# Altium PCB Car_wash_machine.PcbDoc (part 6 of 6)
Units mm, origin at the board's own origin, x right, y up, seen from the top; angles counter-clockwise.
Board outline 229.74 x 149.86 mm, 2 copper layers (Top Layer, Bottom Layer); 256 components, 170 nets, 868 pads, 731 vias.
Unrouted connection lines stored in the file: 362.
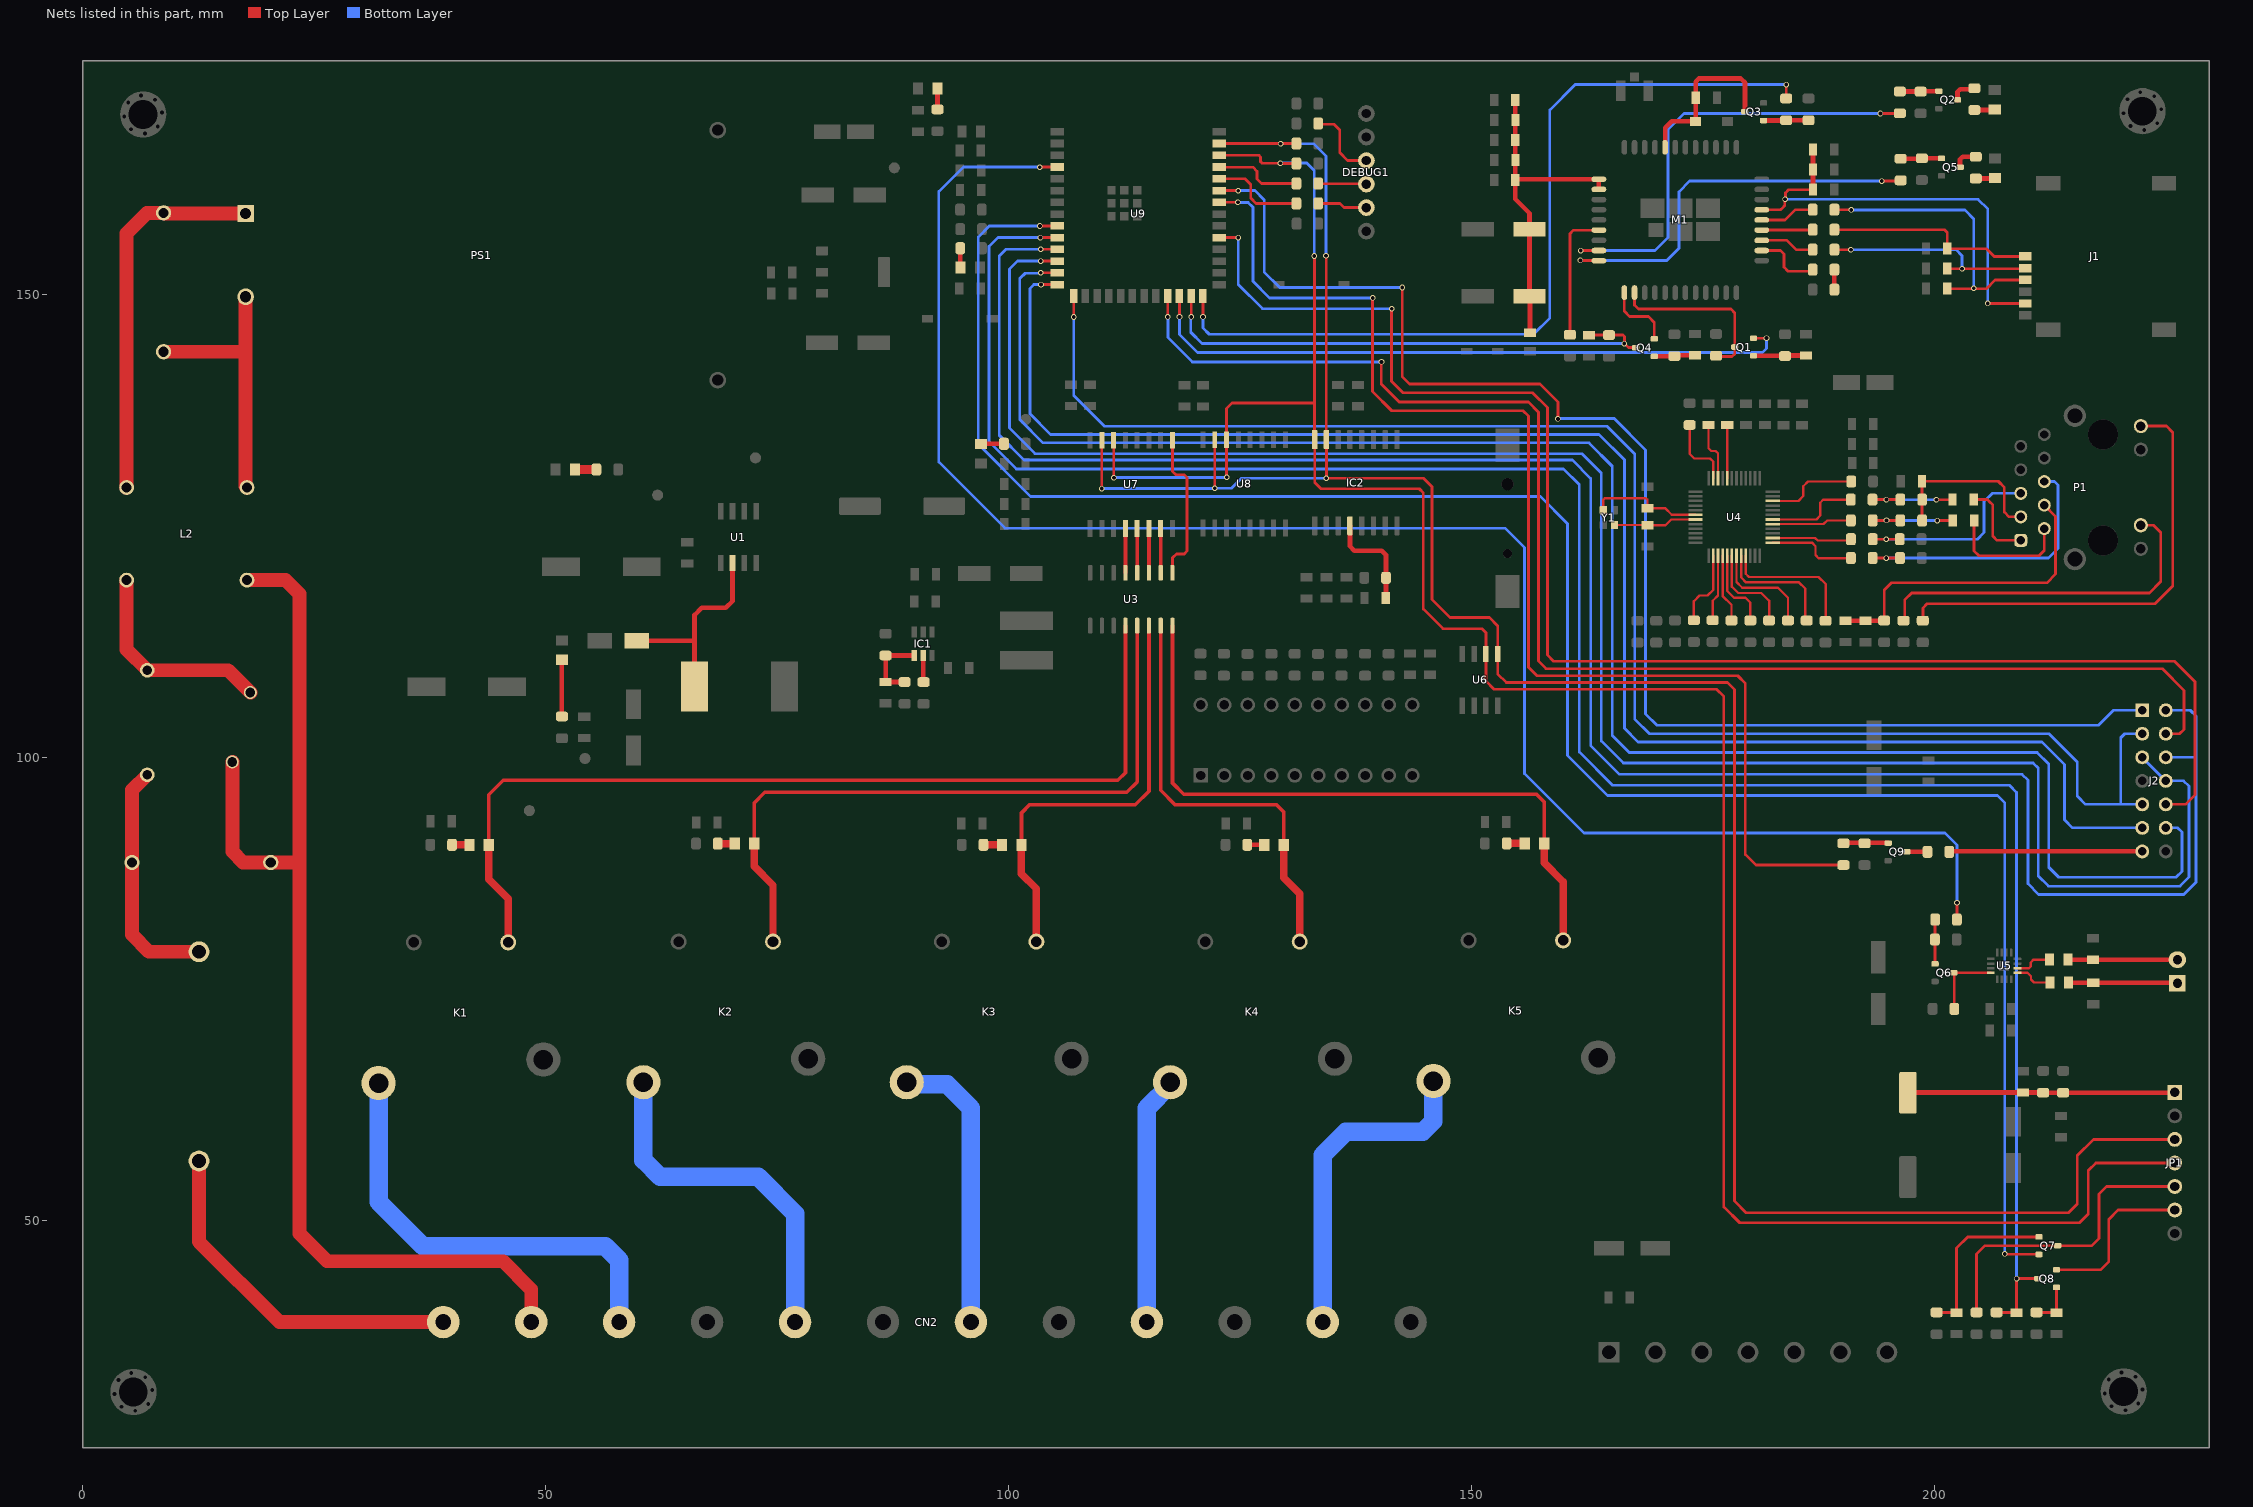
[diagram p3: the nets of this part, all layers, seen from the top]

## Via types
v1: diameter 0.6, hole 0.4, Top Layer to Bottom Layer, tented both sides, 730 vias
v2: diameter 0.6/0.6 (per signal layer), hole 0.4, Top Layer to Bottom Layer, tented both sides, 1 vias

## Nets (pads, with @x,y where several pads share a name; then routed paths per layer and width w, separated by ;. In a path a pad name is that pad's centre, name@x,y a point inside that pad or via, vN(x,y) a via of type N, cw(c..) or ccw(c..) an arc to the next point about the centre after c; other vN are vias at no path point) (continued)
NetC6_2: C6.2 IC1.4 R5.1 R7.2 | length 8
  Top Layer w0.5: C6.2@86.741,108.135 R5.1@88.798,108.134 ; C6.2@86.776,108.169 86.741,108.204 R7.2@86.741,110.991 86.752,111.002 89.844,111.002 IC1.4@89.855,111.013
NetC16_2: C16.2 C17.2 C18.2 C19.2 C20.2 EC4.1 EC5.1 L4.1 M1.34 M1.35 | length 35.9
  Top Layer w0.5: C16.2@154.775,171.018 154.778,171.015 154.778,168.863 C17.2@154.782,168.859 154.778,168.856 154.778,166.704 C18.2@154.775,166.7 154.778,166.697 154.778,164.545 C19.2@154.782,164.541 154.778,164.538 154.778,162.468 C20.2@154.82,162.427 ; L4.1@156.35,145.856 156.35,149.758 EC4.1@156.299,149.809 EC5.1@156.299,157.048 156.299,158.788 154.775,160.312 C20.2@154.775,162.382 C20.2@154.82,162.427 ; M1.35@163.793,161.346 M1.34@163.793,162.446 163.774,162.427 C20.2@154.82,162.427
NetC21_2: C21.2 Q1.1 R14.1 | length 5.7
  Top Layer w0.5: Q1.1@180.492,143.37 R14.1@183.871,143.37 ; R14.1@183.896,143.345 183.959,143.408 C21.2@186.144,143.408
NetC22_1: C22.1 C23.2 C24.2 J1.C1 M1.18 | length 48.1
  Top Layer w0.3: M1.18@181.393,159.146 183.429,159.146 183.629,159.347 183.864,159.581 183.864,160.229 183.966,160.331 183.966,160.979 184.302,161.315 C22.1@186.919,161.315 ; v1@205.803,149.022 v1(205.812,149.03) J1.C1@209.832,149.03
  Top Layer w0.5: C22.1@186.919,161.315 C23.2@186.919,163.474 C24.2@186.919,165.633
  Bottom Layer w0.3: v1(183.909,160.274) 204.753,160.274 205.812,159.215 v1(205.812,149.03)
NetC25_2: C25.2 C34.1 P1.4 R22.2 | length 34.7
  Top Layer w0.3: R22.2@194.615,114.776 194.615,118.085 195.377,118.847 212.192,118.847 213.131,119.786 213.131,126.023 P1.4@211.909,127.246
  Top Layer w0.5: C34.1@190.43,114.751 192.576,114.751 C25.2@192.583,114.745 192.599,114.76 194.599,114.76 R22.2@194.615,114.776 ; C34.1@190.475,114.757 C34.1@190.481,114.751
NetC26_2: C26.2 U4.20 | length 5.8
  Top Layer w0.25: U4.20@177.66,130.135 C26.2@177.66,135.903
NetC27_2: C27.2 U4.22 | length 6.5
  Top Layer w0.25: C27.2@175.628,135.903 175.628,133.388 175.92,133.096 176.403,133.096 176.661,132.838 U4.22@176.661,130.123
NetC28_1: C28.1 P1.1 | length 8.9
  Top Layer w0.3: C28.1@204.299,127.838 205.767,127.838 205.943,127.662 205.943,127.66 206.35,127.254 206.35,123.876 206.79,123.436 P1.1@209.369,123.436
NetC29_1: C29.1 P1.2 | length 13.7
  Top Layer w0.3: C29.1@204.325,125.603 204.325,122.294 204.851,121.768 211.353,121.768 211.909,122.323 P1.2@211.909,124.706
NetC30_1: C30.1 J1.C7 R33.1 | length 23.9
  Top Layer w0.3: R33.1@189.237,154.838 v1(191.021,154.838) ; C30.1@201.423,152.779 201.434,152.768 209.76,152.768 J1.C7@209.771,152.779
  Top Layer w0.5: J1.C7@209.771,152.779 J1.C7@209.832,152.84
  Bottom Layer w0.3: v1(191.021,154.838) 202.362,154.838 203.022,154.178 v1@203.022,152.771
  other v1: 203.022,152.768
NetC31_1: C31.1 J1.C3 R29.1 | length 22.8
  Top Layer w0.3: R29.1@189.237,156.997 201.105,156.997 201.423,156.679 C31.1@201.423,154.938 205.678,154.938 206.507,154.11 J1.C3@209.832,154.11
NetC32_1: C32.1 J1.C2 R25.1 | length 31.8
  Top Layer w0.3: R25.1@189.237,159.156 189.249,159.144 191.046,159.144 v1(191.059,159.131) ; C32.1@201.423,150.62 205.649,150.62 206.599,151.57 J1.C2@209.832,151.57
  Bottom Layer w0.3: v1(191.059,159.131) 203.327,159.131 204.292,158.166 v1(204.292,150.66)
NetC33_1: C33.1 P1.3 R39.2 R40.2 | length 18.1
  Top Layer w0.3: R40.2@198.705,125.59 198.708,125.593 198.708,127.835 R39.2@198.711,127.838 198.711,129.813 C33.1@198.704,129.819 206.934,129.819 207.594,129.159 207.594,126.492 208.111,125.976 P1.3@209.369,125.976
NetC35_2: C35.2 Q4.1 R41.1 | length 4.4
  Top Layer w0.5: Q4.1@169.78,143.309 R41.1@171.916,143.309 ; R41.1@171.931,143.324 172.034,143.427 C35.2@174.18,143.427
NetC37_1: C37.1 D8.2 M1.29 Q3.3 | length 18.8
  Top Layer w0.5: M1.29@170.943,165.896 170.943,167.997 171.657,168.711 174.25,168.711 C37.1@174.25,171.247 174.25,172.98 174.6,173.33 179.121,173.33 179.584,172.866 Q3.3@179.584,169.736
NetC61_1: C61.1 CN1.1 L6.2 | length 11.8
  Top Layer w0.5: L6.2@214.538,75.692 214.563,75.667 217.17,75.667 C61.1@217.195,75.641 226.25,75.641 CN1.1@226.289,75.603
NetC62_1: C62.1 CN1.2 L5.2 | length 11.8
  Top Layer w0.5: L5.2@214.462,78.143 C62.1@217.145,78.143 CN1.2@226.289,78.143
NetC67_2: C67.2 Q7.1 R63.1 | length 18.5
  Top Layer w0.3: R63.1@200.279,40.037 202.413,40.037 C67.2@202.438,40.012 202.438,46.99 203.642,48.194 Q7.1@211.334,48.194
NetC70_2: C70.2 IC2.4 R66.1 | length 11.1
  Top Layer w0.5: IC2.4@136.906,125.012 136.906,122.809 137.389,122.326 140.335,122.326 140.791,121.87 140.791,117.246 C70.2@140.779,117.234
NetC71_2: C71.2 Q8.1 R67.1 | length 4.9
  Top Layer w0.3: R67.1@211.074,40.037 213.208,40.037 C71.2@213.227,40.018 ; Q8.1@213.227,42.738 C71.2@213.227,40.018 ; C71.2@213.233,40.012 C71.2@213.227,40.018
NetCF1_1: CF1.1 CN2.2 L2.3 MOV1.1 | length 123.9
  Top Layer w1.5: MOV1.1@16.172,99.501 16.172,89.818 17.344,88.646 CF1.1@20.327,88.646 23.406,88.646 23.419,88.659 ; L2.3@17.752,119.142 21.916,119.142 23.419,117.64 23.419,88.659 ; CN2.2@48.462,38.989 48.462,42.533 45.428,45.568 26.416,45.568 23.419,48.565 23.419,88.659
NetCF1_2: CF1.2 F1.2 GDT1.A | length 26
  Top Layer w1.5: GDT1.A@6.985,98.109 5.327,96.451 CF1.2@5.327,88.646 5.327,80.843 7.178,78.991 F1.2@12.573,78.991
NetCF2_1: CF2.1 L2.2 PS1.2 | length 29.7
  Top Layer w1.5: CF2.1@8.75,143.813 17.172,143.813 17.612,143.373 ; PS1.2@17.612,149.746 17.612,143.373 ; L2.2@17.752,129.143 17.752,129.17 17.612,129.31 17.612,143.373
NetCF2_2: CF2.2 L2.1 PS1.1 | length 41.2
  Top Layer w1.5: L2.1@4.752,129.143 4.752,156.606 6.96,158.814 CF2.2@8.75,158.814 ; CF2.2@8.818,158.746 PS1.1@17.612,158.746
NetCN2_1: CN2.1 F1.1 | length 38.7
  Top Layer w1.5: F1.1@12.573,56.391 12.573,47.663 21.247,38.989 CN2.1@38.962,38.989
NetD1_2: D1.2 L1.1 U1.2 | length 22.8
  Top Layer w0.5: D1.2@59.874,112.598 66.105,112.598 ; L1.1@66.105,107.645 66.105,112.598 ; U1.2@70.206,120.98 70.206,116.878 69.482,116.154 66.891,116.154 66.105,115.368 66.105,112.598
NetD2_1: D2.1 R2.1 | length 2.3
  Top Layer w1: D2.1@53.209,131.102 R2.1@55.492,131.102
NetD3_1: D3.1 R1.1 | length 6.1
  Top Layer w0.5: R1.1@51.778,104.432 D3.1@51.778,110.532
NetD4_1: D4.1 R4.1 | length 2.5
  Top Layer w0.5: D4.1@97.041,133.841 97.055,133.856 99.509,133.856 R4.1@99.523,133.871
NetD5_1: D5.1 R6.1 | length 2.3
  Top Layer w0.5: R6.1@92.342,169.99 92.348,169.996 92.348,172.256 D5.1@92.354,172.263
NetD7_2: D7.2 R31.2 | length 2.2
  Top Layer w0.5: R31.2@204.357,169.924 206.506,169.924 D7.2@206.554,169.973
NetD9_2: D9.2 R46.2 | length 2.1
  Top Layer w0.5: R46.2@204.506,162.526 206.559,162.526 D9.2@206.601,162.568
NetD10_1: D10.1 R45.1 | length 1.9
  Top Layer w0.8: R45.1@39.91,90.551 D10.1@41.783,90.551
NetD11_1: D11.1 R49.1 | length 1.8
  Top Layer w0.8: R49.1@68.612,90.678 D11.1@70.451,90.678
NetD12_1: D12.1 R50.1 | length 2
  Top Layer w0.8: R50.1@97.314,90.551 D12.1@99.314,90.551
NetD13_1: D13.1 R53.1 | length 1.8
  Top Layer w0.5: R53.1@125.813,90.551 D13.1@127.652,90.551
NetD14_1: D14.1 R54.1 | length 2
  Top Layer w0.8: R54.1@153.829,90.703 D14.1@155.795,90.703
NetD15_1: D15.1 R58.1 | length 2.1
  Top Layer w0.5: R58.1@94.805,154.991 94.816,154.98 94.816,152.944 D15.1@94.826,152.933
NetDEBUG1_3: DEBUG1.3 R80.2 | length 8.3
  Top Layer w0.3: R80.2@133.471,168.465 133.547,168.389 135.166,168.389 135.801,167.754 135.801,165.316 136.652,164.465 DEBUG1.3@138.684,164.465
NetDEBUG1_4: DEBUG1.4 R82.2 | length 5.2
  Top Layer w0.3: R82.2@133.471,161.988 133.503,161.957 138.652,161.957 DEBUG1.4@138.684,161.925
NetDEBUG1_5: DEBUG1.5 R84.2 | length 5.4
  Top Layer w0.3: R84.2@133.471,159.829 135.826,159.829 136.271,159.385 DEBUG1.5@138.684,159.385
NetGDT1_B: GDT1.B L2.4 MOV1.2 | length 22.8
  Top Layer w1.5: L2.4@4.752,119.142 4.752,111.642 GDT1.B@6.985,109.409 15.71,109.409 MOV1.2@18.118,107.001
NetIC1_5: IC1.5 R3.2 | length 2.9
  Top Layer w0.5: IC1.5@90.805,111.013 90.824,110.994 90.824,108.147 R3.2@90.843,108.128
NetJ2_13: J2.13 R78.2 | length 20.9
  Top Layer w0.3: R78.2@201.638,89.789 R78.2@201.67,89.757 ; J2.13@222.46,89.872 J2.13@222.491,89.84
  Top Layer w0.5: R78.2@201.638,89.789 R78.2@201.651,89.802 ; R78.2@201.638,89.872 J2.13@222.46,89.872
NetL5_1: L5.1 U5.10 | length 4.1
  Top Layer w0.25: U5.10@209.004,77.22 210.265,77.22 210.439,77.394 210.439,77.826 210.756,78.143 L5.1@212.462,78.143
NetL6_1: L6.1 U5.9 | length 4.2
  Top Layer w0.25: U5.9@209.004,76.72 210.097,76.72 210.464,76.352 210.464,75.997 210.795,75.667 212.512,75.667 L6.1@212.538,75.692
NetM1_14: M1.14 NC2.2 | length 7.3
  Top Layer w0.3: M1.14@181.393,154.746 183.417,154.746 183.794,154.368 183.794,152.946 184.239,152.502 186.709,152.502 NC2.2@186.887,152.679
NetM1_15: M1.15 R33.2 | length 5.9
  Top Layer w0.3: M1.15@181.393,155.846 184.095,155.846 185.102,154.838 R33.2@186.887,154.838
NetM1_16: M1.16 R29.2 | length 5.5
  Top Layer w0.3: M1.16@181.393,156.946 181.412,156.965 186.854,156.965 R29.2@186.887,156.997
NetM1_17: M1.17 R25.2 | length 6
  Top Layer w0.3: M1.17@181.393,158.046 183.902,158.046 185.012,159.156 R25.2@186.887,159.156
NetM1_39: M1.39 R36.2 | length 14.3
  Top Layer w0.3: R36.2@160.363,145.644 160.668,145.948 160.668,156.553 161.061,156.946 M1.39@163.793,156.946
NetM1_41: M1.41 R35.1 | length 49.4
  Top Layer w0.3: v1(161.823,154.737) 161.828,154.741 163.788,154.741 M1.41@163.793,154.746 ; v1@194.221,169.557 196.291,169.557 R35.1@196.304,169.57
  Bottom Layer w0.3: v1(161.823,154.737) 169.85,154.737 171.272,156.159 171.272,167.818 172.999,169.545 v1(194.208,169.545)
NetM1_42: M1.42 R47.1 | length 43.8
  Top Layer w0.3: v1(161.798,153.67) 161.81,153.658 163.781,153.658 M1.42@163.793,153.646 ; v1(194.348,162.249) 196.323,162.249 R47.1@196.393,162.319
  Bottom Layer w0.3: v1(161.798,153.67) 171.12,153.67 172.441,154.991 172.441,161.087 173.603,162.249 v1(194.348,162.249)
NetNC1_2: NC1.2 NC2.1 | length 2.2
  Top Layer w0.5: NC1.2@189.237,150.52 NC2.1@189.237,152.679
NetP1_12: P1.12 R34.1 | length 38.5
  Top Layer w0.3: R34.1@196.698,114.764 196.825,114.891 196.825,116.98 197.587,117.742 223.253,117.742 224.485,118.974 224.485,124.282 223.702,125.066 P1.12@222.339,125.066
NetP1_14: P1.14 R28.1 | length 49.7
  Top Layer w0.3: R28.1@198.78,114.764 198.806,114.789 198.806,116.141 199.263,116.599 223.888,116.599 225.781,118.491 225.781,135.103 225.107,135.776 P1.14@222.339,135.776
NetQ2_1: Q2.1 R35.2 R38.2 | length 4.2
  Top Layer w0.5: R35.2@196.304,171.92 R38.2@198.546,171.92 ; R38.2@198.552,171.914 198.598,171.96 Q2.1@200.515,171.96
NetQ2_3: Q2.3 R31.1 | length 2.9
  Top Layer w0.5: Q2.3@202.535,171.01 202.535,171.892 202.828,172.185 R31.1@204.446,172.185
NetQ3_1: Q3.1 R43.2 R44.2 | length 4.9
  Top Layer w0.5: Q3.1@181.579,168.785 183.987,168.785 R43.2@184.023,168.821 R44.2@186.436,168.821
NetQ5_1: Q5.1 R47.2 R48.2 | length 4.4
  Top Layer w0.5: R47.2@196.393,164.669 198.641,164.669 R48.2@198.679,164.707 ; R48.2@198.688,164.698 Q5.1@200.806,164.698
NetQ5_3: Q5.3 R46.1 | length 2.7
  Top Layer w0.5: Q5.3@202.826,163.748 202.806,163.767 202.806,164.583 203.099,164.876 R46.1@204.506,164.876
NetQ6_1: Q6.1 R56.2 R57.2 | length 4.8
  Top Layer w0.3: Q6.1@200.107,77.683 200.101,77.69 200.101,80.309 R57.2@200.095,80.315 200.107,80.328 200.107,82.461 R56.2@200.12,82.474
NetQ6_3: Q6.3 R55.2 U5.4 | length 7.9
  Top Layer w0.25: Q6.3@202.127,76.733 Q6.3@202.181,76.68 ; Q6.3@202.254,76.708 202.26,76.714 206.128,76.714 U5.4@206.134,76.72
  Top Layer w0.3: Q6.3@202.127,76.733 202.191,76.67 R55.2@202.191,72.822
NetQ9_1: Q9.1 R79.2 R83.2 | length 4.9
  Top Layer w0.5: R79.2@190.208,90.71 190.25,90.752 R83.2@192.494,90.752 ; R83.2@192.494,90.71 192.536,90.752 Q9.1@195.04,90.752
NetQ9_3: Q9.3 R78.1 | length 2.2
  Top Layer w0.3: Q9.3@197.06,89.802 Q9.3@197.066,89.795
  Top Layer w0.5: Q9.3@197.066,89.795 199.282,89.795 R78.1@199.288,89.789
NetR8_1: R8.1 U4.45 | length 15
  Top Layer w0.25: U4.45@179.661,121.763 179.661,119.83 180.01,119.482 187.528,119.482 188.316,118.694 188.316,114.783 R8.1@188.278,114.745
NetR9_1: R9.1 U4.44 | length 13.3
  Top Layer w0.25: U4.44@179.161,121.763 179.161,119.416 179.68,118.897 185.42,118.897 186.08,118.237 186.08,114.942 R9.1@186.245,114.776
NetR10_2: R10.2 U4.1 | length 9.7
  Top Layer w0.25: U4.1@182.591,123.193 186.814,123.193 187.198,122.809 187.198,121.844 187.528,121.514 191.008,121.514 R10.2@191.021,121.526
NetR11_1: R11.1 U4.43 | length 11.5
  Top Layer w0.25: U4.43@178.661,121.763 178.661,118.925 179.273,118.313 183.134,118.313 184.213,117.234 R11.1@184.213,114.776
NetR12_2: R12.2 U4.2 | length 8.6
  Top Layer w0.25: U4.2@182.591,123.693 187.152,123.693 187.427,123.419 190.881,123.419 R12.2@191.021,123.558
NetR13_1: R13.1 U4.42 | length 10.1
  Top Layer w0.25: U4.42@178.161,121.763 178.161,118.435 178.841,117.754 181.331,117.754 182.181,116.903 R13.1@182.181,114.776
NetR16_1: R16.1 U4.41 | length 8.7
  Top Layer w0.25: U4.41@177.661,121.763 177.661,117.969 178.384,117.246 179.633,117.246 180.149,116.73 R16.1@180.149,114.776
NetR17_2: R17.2 U4.5 | length 8.6
  Top Layer w0.25: U4.5@182.591,125.193 188.058,125.193 188.455,125.59 R17.2@191.021,125.59
NetR18_1: R18.1 U4.40 | length 7.4
  Top Layer w0.25: U4.40@177.161,121.763 177.161,117.428 178.118,116.472 R18.1@178.118,114.776
NetR19_1: R19.1 U4.39 | length 7.2
  Top Layer w0.25: R19.1@176.085,114.808 176.085,116.903 176.661,117.479 U4.39@176.661,121.763
NetR20_2: R20.2 U4.6 | length 10.1
  Top Layer w0.25: U4.6@182.591,125.693 187.288,125.693 187.706,126.111 187.706,127.508 188.036,127.838 R20.2@191.001,127.838
NetR24_1: R24.1 U4.38 | length 8.3
  Top Layer w0.25: R24.1@174.053,114.808 174.053,116.853 174.676,117.475 175.531,117.475 176.161,118.105 U4.38@176.161,121.763
NetR27_2: R27.2 U4.10 | length 10
  Top Layer w0.25: U4.10@182.591,127.693 185.351,127.693 185.877,128.219 185.877,129.286 186.385,129.794 R27.2@191.052,129.794
NetR37_2: R37.2 U4.23 | length 7.8
  Top Layer w0.25: R37.2@173.599,135.9 173.599,132.775 174.102,132.273 175.804,132.273 176.161,131.915 U4.23@176.161,130.123
NO1: CN2.3 K1.NO | length 48.1
  Bottom Layer w2: K1.NO@31.974,64.81 31.974,51.986 36.779,47.18 56.452,47.18 57.962,45.67 CN2.3@57.962,38.989
NO2: CN2.5 K2.NO | length 38.9
  Bottom Layer w2: K2.NO@60.579,64.897 60.579,56.49 62.382,54.686 72.974,54.686 76.962,50.698 CN2.5@76.962,38.989
NO3: CN2.7 K3.NO | length 31.2
  Bottom Layer w2: K3.NO@89.027,64.897 89.241,64.683 93.381,64.683 95.962,62.102 CN2.7@95.962,38.989
NO4: CN2.9 K4.NO | length 26.9
  Bottom Layer w2: CN2.9@114.962,38.989 114.962,62.082 117.475,64.595 K4.NO@117.475,64.897
NO5: CN2.11 K5.NO | length 35.8
  Bottom Layer w2: CN2.11@133.962,38.989 133.962,57.038 136.462,59.538 144.751,59.538 145.923,60.709 K5.NO@145.923,65.024
RELAY1: D10.2 K1.A2 U3.12 | length 102.5
  Top Layer w0.4: D10.2@43.883,90.551 43.883,95.953 45.441,97.511 111.823,97.511 112.649,98.336 U3.12@112.649,114.226
  Top Layer w0.8: D10.2@43.883,90.551 43.883,86.813 45.974,84.722 K1.A2@45.974,80.01
RELAY2: D11.2 K2.A2 U3.13 | length 75
  Top Layer w0.4: D11.2@72.551,90.678 72.555,90.682 72.555,95.072 73.698,96.215 112.789,96.215 113.919,97.346 U3.13@113.919,114.226
  Top Layer w0.8: D11.2@72.551,90.678 72.551,88.223 74.579,86.195 K2.A2@74.579,80.097
RELAY3: D12.2 K3.A2 U3.14 | length 47.2
  Top Layer w0.4: D12.2@101.414,90.551 101.414,93.997 102.286,94.869 113.716,94.869 115.189,96.342 U3.14@115.189,114.226
  Top Layer w0.8: D12.2@101.414,90.551 101.414,87.435 103.027,85.822 K3.A2@103.027,80.097
RELAY4: D13.2 K4.A2 U3.15 | length 46.8
  Top Layer w0.4: U3.15@116.459,114.226 116.459,96.431 118.008,94.882 128.968,94.882 129.752,94.098 D13.2@129.752,90.551
  Top Layer w0.8: D13.2@129.752,90.551 129.752,86.986 131.475,85.263 K4.A2@131.475,80.097
RELAY5: D14.2 K5.A2 U3.16 | length 73.8
  Top Layer w0.4: U3.16@117.729,114.226 117.729,97.231 118.961,95.999 157.061,95.999 157.895,95.165 D14.2@157.895,90.703
  Top Layer w0.8: D14.2@157.895,90.703 157.895,88.599 159.923,86.571 K5.A2@159.923,80.224
RESET_SIM: R43.1 U9.26 | length 92.6
  Top Layer w0.3: U9.26@121.018,149.816 121.025,149.81 121.025,147.58 v1(121.031,147.574) ; R43.1@184.023,171.171 v1(184.023,172.669)
  Bottom Layer w0.3: v1(121.031,147.574) 121.031,146.368 121.704,145.694 156.731,145.694 158.496,147.46 158.496,169.926 161.239,172.669 v1(184.023,172.669)
RL1_MCU: U3.1 U7.9 | length 16.7
  Top Layer w0.3: U3.1@117.729,119.926 117.742,119.939 117.742,121.552 118.16,121.971 118.998,121.971 119.304,122.276 119.304,130.213 118.986,130.531 118.085,130.531 117.729,130.886 U7.9@117.729,134.264
RL2_MCU: U3.2 U7.7 | length 4.8
  Top Layer w0.4: U3.2@116.459,119.926 U7.7@116.459,124.714
RL3_MCU: U3.3 U7.6 | length 4.8
  Top Layer w0.4: U3.3@115.189,119.926 U7.6@115.189,124.714
RL4_MCU: U3.4 U7.5 | length 4.8
  Top Layer w0.4: U3.4@113.919,119.926 U7.5@113.919,124.714
RL5_MCU: U3.5 U7.4 | length 4.8
  Top Layer w0.4: U3.5@112.649,119.926 U7.4@112.649,124.714
RX1_ESP: C72.2 Q8.3 R68.1 U9.10 | length 233.1
  Top Layer w0.3: v1(103.467,156.147) U9.10@105.283,156.147 ; R68.1@206.756,40.037 208.89,40.037 C72.2@208.915,40.012 v1(208.915,43.688) Q8.3@211.207,43.688
  Bottom Layer w0.3: v1(103.467,156.147) 98.87,156.147 97.917,155.194 97.917,134.099 100.863,131.153 159.969,131.153 161.684,129.438 161.684,100.571 165.278,96.977 208.153,96.977 208.915,96.215 v1(208.915,43.688)
RX_MAIN: R84.1 U9.36 | length 10.3
  Top Layer w0.3: U9.36@122.783,162.496 125.551,162.496 126.187,161.86 126.187,160.412 126.77,159.829 R84.1@131.121,159.829
RX_SIM: C36.2 Q4.3 R42.1 U9.25 | length 57.3
  Top Layer w0.3: U9.25@119.748,149.816 119.755,149.81 119.755,147.58 v1(119.761,147.574) ; C36.2@162.725,145.593 162.744,145.612 166.39,145.612 166.566,145.436 166.566,144.714 v1(166.548,144.696) 166.985,144.259 Q4.3@167.76,144.259
  Bottom Layer w0.3: v1(119.761,147.574) 119.704,147.517 119.704,145.916 120.916,144.704 166.54,144.704 v1(166.548,144.696)
RXD: JP1.6 Q8.2 | length 18.1
  Top Layer w0.3: Q8.2@213.227,44.638 217.993,44.638 218.882,45.527 218.882,50.099 219.888,51.105 JP1.6@226.009,51.105
RXD_MODULE_SIM: M1.2 Q1.3 R15.1 | length 19.1
  Top Layer w0.3: M1.2@167.643,150.196 167.643,148.841 168.059,148.425 178.054,148.425 178.472,148.007 Q1.3@178.472,144.32 178.472,143.587 178.18,143.294 176.536,143.294 R15.1@176.454,143.376
RXN: C29.2 R17.1 R40.1 | length 10.1
  Top Layer w0.3: R17.1@193.371,125.59 v1(194.863,125.59) R40.1@196.355,125.59 ; v1(200.355,125.578) 201.999,125.578 C29.2@202.025,125.603
  Bottom Layer w0.3: v1@194.875,125.578 v1(200.355,125.578)
RXP: C28.2 R20.1 R39.1 | length 10.1
  Top Layer w0.3: R20.1@193.351,127.838 v1(194.856,127.838) R39.1@196.361,127.838 ; v1(200.254,127.813) C28.2@201.923,127.813
  Bottom Layer w0.3: v1(194.856,127.838) 194.869,127.825 200.215,127.825 v1@200.228,127.813
SCL_ESP: IC2.16 JP1.4 R60.1 U6.6 U7.14 U8.14 U9.38 | length 254.3
  Top Layer w0.3: U7.14@111.379,134.264 111.392,134.252 111.392,130.226 v1(111.404,130.213) ; U9.38@122.783,165.036 127.078,165.036 127.254,164.861 127.254,164.342 127.43,164.166 v1(129.394,164.166) 129.403,164.157 131.111,164.157 R60.1@131.121,164.147 ; v1(123.584,130.251) 123.577,130.258 123.577,134.309 U8.14@123.571,134.315 123.571,137.681 124.168,138.278 133.071,138.278 ; v1(133.045,154.153) 133.071,154.127 133.071,138.278 ; IC2.16@133.071,134.322 133.071,138.278 ; IC2.16@133.096,134.322 133.096,129.692 133.782,129.007 144.386,129.007 144.831,128.562 144.831,116.014 146.952,113.894 151.143,113.894 151.587,113.449 U6.6@151.587,111.175 151.587,108.229 152.463,107.353 176.492,107.353 177.292,106.553 177.292,51.435 179.007,49.721 215.709,49.721 216.662,50.673 216.662,55.372 217.475,56.185 JP1.4@226.009,56.185
  Bottom Layer w0.3: v1(111.404,130.213) 111.423,130.232 123.565,130.232 v1(123.584,130.251) ; v1(129.394,164.166) 129.413,164.186 132.232,164.186 133.045,163.373 v1(133.045,154.153)
SD_MODE: R56.1 U9.4 | length 192.6
  Top Layer w0.3: v1(103.391,163.754) 103.391,163.766 U9.4@105.283,163.766 ; R56.1@202.47,82.474 202.473,82.477 202.473,84.274 v1(202.476,84.277)
  Bottom Layer w0.3: v1@103.391,163.779 95.161,163.779 92.494,161.112 92.494,131.902 99.644,124.752 153.67,124.752 155.766,122.657 155.766,98.234 162.179,91.821 201.181,91.821 202.476,90.526 v1(202.476,84.277)
SDA_ESP: IC2.15 JP1.3 R59.1 U6.5 U7.15 U8.15 U9.39 | length 257.2
  Top Layer w0.3: v1(110.084,129.032) 110.096,129.045 110.096,134.252 U7.15@110.109,134.264 ; v1(122.301,129.057) U8.15@122.301,134.315 ; U9.39@122.783,166.306 122.793,166.297 129.397,166.297 v1(129.407,166.287) 129.416,166.297 131.111,166.297 R59.1@131.121,166.306 ; v1(134.315,154.178) 134.341,154.153 IC2.15@134.341,134.322 ; v1(134.341,130.15) 134.417,130.226 134.417,130.212 134.479,130.15 144.844,130.15 145.771,129.222 145.771,117.043 147.726,115.087 151.968,115.087 152.87,114.186 152.87,113.284 152.864,113.278 152.864,111.181 U6.5@152.857,111.175 152.857,109.017 153.797,108.077 177.673,108.077 178.435,107.315 178.435,52.07 179.705,50.8 214.503,50.8 215.468,51.765 215.468,56.972 217.221,58.725 JP1.3@226.009,58.725 ; IC2.15@134.366,134.322 134.366,130.288 v1@134.407,130.248
  Bottom Layer w0.3: v1(110.084,129.032) 122.276,129.032 v1(122.301,129.057) 124.079,129.057 125.171,130.15 v1(134.341,130.15) ; v1@129.434,166.287 132.963,166.287 134.315,164.935 v1(134.315,154.178)
T_CS: J2.4 U9.23 | length 153.6
  Top Layer w0.3: U9.23@117.208,149.816 117.221,149.804 117.221,147.587 v1(117.234,147.574) ; v1(140.31,142.71) 140.284,142.684 140.284,140.31 142.227,138.367 156.172,138.367 157.264,137.274 157.264,110.401 158.09,109.576 224.65,109.576 227,107.226 227,103.022 226.517,102.54 J2.4@225.031,102.54
  Bottom Layer w0.3: v1(117.234,147.574) 117.234,145.351 119.875,142.71 v1(140.31,142.71)
T_IRQ: J2.1 U9.35 | length 152.3
  Top Layer w0.3: U9.35@122.783,161.226 122.789,161.22 124.822,161.22 v1(124.828,161.214) ; v1(142.545,150.749) 142.545,141.135 143.345,140.335 157.429,140.335 159.372,138.392 v1(159.372,136.55)
  Bottom Layer w0.3: v1(124.828,161.214) 126.644,161.214 127.635,160.223 127.635,152.438 129.324,150.749 v1(142.545,150.749) ; v1(159.372,136.55) 159.41,136.588 165.456,136.588 168.834,133.21 168.834,104.699 170.07,103.463 217.763,103.463 219.38,105.08 J2.1@222.491,105.08
TFT_CS: J2.12 U9.13 | length 195.6
  Top Layer w0.3: v1(103.505,152.337) U9.13@105.283,152.337
  Bottom Layer w0.3: v1(103.505,152.337) 103.461,152.292 101.822,152.292 101.232,151.701 101.232,136.487 103.746,133.972 162.712,133.972 165.24,131.445 165.24,102.349 167.069,100.52 211.137,100.52 212.395,99.263 212.395,88.125 213.474,87.046 226.149,87.046 226.771,87.668 226.771,91.935 226.327,92.38 J2.12@225.031,92.38
TFT_DC: J2.10 U9.31 | length 164.3
  Top Layer w0.3: U9.31@122.783,156.147 v1(124.841,156.147) ; v1(141.415,148.463) 141.389,148.438 141.389,140.627 142.634,139.382 156.616,139.382 158.229,137.77 158.229,111.049 158.902,110.376 225.984,110.376 228.194,108.166 228.194,95.936 227.178,94.92 J2.10@225.031,94.92
  Bottom Layer w0.3: v1(124.841,156.147) 124.841,151.092 127.47,148.463 v1(141.415,148.463)
TFT_GND: R79.1 U9.34 | length 134.4
  Top Layer w0.3: U9.34@122.783,159.957 122.789,159.95 124.797,159.95 v1(124.803,159.944) ; v1(139.357,149.619) 139.332,149.593 139.332,139.522 141.415,137.439 155.613,137.439 156.185,136.868 156.185,109.728 157.099,108.814 178.791,108.814 179.616,107.988 179.616,89.497 180.753,88.36 R79.1@190.208,88.36
  Bottom Layer w0.3: v1(124.803,159.944) 125.908,159.944 126.428,159.423 126.428,151.422 128.232,149.619 v1(139.357,149.619)
TFT_MISO: J2.2 J2.6 U9.11 | length 224.5
  Top Layer w0.3: v1(103.492,154.876) U9.11@105.283,154.876
  Bottom Layer w0.3: v1(103.492,154.876) 99.733,154.876 99.022,154.165 99.022,134.785 101.702,132.105 160.934,132.105 162.903,130.137 162.903,101.257 166.002,98.158 209.512,98.158 210.134,97.536 210.134,86.347 211.29,85.192 226.974,85.192 228.282,86.5 228.282,100.127 ; J2.6@225.031,100 228.155,100 228.282,100.127 ; J2.2@225.031,105.08 227.673,105.08 228.282,104.47 228.282,100.127
TFT_MOSI: J2.3 J2.9 U9.15 | length 173.1
  Top Layer w0.25: U9.15@107.048,149.816 U9.15@107.061,149.804
  Top Layer w0.3: v1(107.061,147.561) U9.15@107.061,149.804
  Bottom Layer w0.3: v1(107.061,147.561) 107.061,139.078 110.376,135.763 164.655,135.763 167.678,132.74 167.678,104.102 169.24,102.54 212.42,102.54 215.468,99.492 215.468,95.809 216.357,94.92 220.167,94.92 ; J2.9@222.491,94.92 220.167,94.92 ; J2.3@222.491,102.54 220.599,102.54 220.167,102.108 220.167,94.92
TFT_RST: J2.11 U9.14 | length 175.8
  Top Layer w0.3: v1(103.53,151.066) U9.14@105.283,151.066
  Bottom Layer w0.3: v1(103.53,151.066) 102.756,151.066 102.337,150.647 102.337,137.109 104.572,134.874 163.817,134.874 166.548,132.143 166.548,103.137 168.034,101.651 211.658,101.651 214.084,99.225 214.084,93.256 214.96,92.38 J2.11@222.491,92.38
TFT_SCK: J2.5 J2.8 U9.12 | length 210.9
  Top Layer w0.3: v1(103.505,153.606) U9.12@105.283,153.606
  Bottom Layer w0.3: v1(103.505,153.606) 101.003,153.606 100.127,152.73 100.127,135.56 102.887,132.8 161.942,132.8 164.059,130.683 164.059,101.752 166.433,99.377 210.706,99.377 211.252,98.831 211.252,87.198 212.369,86.081 226.555,86.081 227.533,87.058 227.533,96.888 226.962,97.46 J2.8@225.031,97.46 J2.5@222.491,100
TX1_ESP: Q7.2 U9.9 | length 225.4
  Top Layer w0.3: v1(103.416,157.391) 103.429,157.404 105.27,157.404 U9.9@105.283,157.416 ; v1(207.645,46.355) 207.676,46.324 211.303,46.324 Q7.2@211.334,46.294
  Bottom Layer w0.3: v1(103.416,157.391) 97.942,157.391 96.761,156.21 96.761,133.82 102.4,128.181 157.467,128.181 160.414,125.235 160.414,100.19 164.732,95.872 206.845,95.872 207.645,95.072 v1(207.645,46.355)
TX_MAIN: R82.1 U9.37 | length 9.6
  Top Layer w0.3: U9.37@122.783,163.766 122.799,163.75 126.424,163.75 126.873,163.301 126.873,162.463 127.347,161.988 R82.1@131.121,161.988
TX_SIM: Q1.2 U9.24 | length 71.1
  Top Layer w0.3: U9.24@118.478,149.816 118.485,149.81 118.485,147.58 v1(118.491,147.574) ; Q1.2@180.492,145.27 180.501,145.279 181.893,145.279 v1(181.902,145.288)
  Bottom Layer w0.3: v1(118.491,147.574) 118.491,145.669 120.421,143.739 181.47,143.739 181.902,144.17 v1(181.902,145.288)
TXD: JP1.5 Q7.3 R64.1 | length 33.6
  Top Layer w0.3: R64.1@204.597,40.037 204.597,46.355 205.486,47.244 217.043,47.244 217.805,48.006 217.805,52.832 218.618,53.645 JP1.5@226.009,53.645
TXD_MODULE_SIM: M1.1 Q4.2 | length 8.1
  Top Layer w0.3: M1.1@166.543,150.73 166.543,148.188 167.119,147.611 169.151,147.611 169.78,146.982 Q4.2@169.78,145.209
TXN: P1.6 R10.1 R23.2 | length 30.4
  Top Layer w0.3: R10.1@193.371,121.526 v1(194.847,121.526) R23.2@196.323,121.526
  Bottom Layer w0.3: v1(194.847,121.526) 212.357,121.526 213.385,122.555 213.385,129.413 213.013,129.786 P1.6@211.909,129.786
TXP: P1.5 R12.1 R21.2 | length 21.5
  Top Layer w0.3: R12.1@193.371,123.558 v1(194.831,123.558) R21.2@196.291,123.558
  Bottom Layer w0.3: v1(194.831,123.558) 204.686,123.558 205.41,124.282 205.41,127.635 206.29,128.516 P1.5@209.369,128.516
VCC: C63.1 C65.1 JP1.1 R61.1 R62.1 | length 28.9
  Top Layer w0.5: C63.1@197.18,63.757 197.221,63.798 C65.1@209.626,63.798 209.639,63.785 211.773,63.785 R61.1@211.785,63.773 R62.1@213.944,63.773 225.977,63.773 JP1.1@226.009,63.805
XIN: C41.1 U4.30 Y1.3 | length 12.4
  Top Layer w0.25: Y1.3@164.281,126.695 164.281,127.838 164.427,127.984 168.891,127.984 169.037,127.838 C41.1@169.037,126.917 170.517,126.917 170.543,126.891 170.974,126.891 171.673,126.193 U4.30@174.231,126.193
XOUT: C40.1 U4.31 Y1.1 | length 9
  Top Layer w0.25: Y1.1@165.481,125.095 169.037,125.095 C40.1@169.062,125.07 170.993,125.07 171.616,125.693 U4.31@174.231,125.693
pads on no net: BH1. GND.0@48.26,94.234 H1.1 H2.1 H3.1 H4.1 IC2.1 IC2.3 IC2.5 IC2.6 IC2.7 IC2.8 IC2.9 IC2.10 IC2.11 IC2.12 J1.C6 M1.3 M1.4 M1.5 M1.6 M1.7 M1.9 M1.10 M1.11 M1.12 M1.20 M1.22 M1.23 M1.24 M1.25 M1.26 M1.28 M1.38 P1.9 P1.10 P1.MH1 P1.MH2 SD1.10B U2.4 U3.6 U3.7 U3.10 U3.11 U4.7 U4.12 U4.13 U4.18 U4.24 U4.26 U4.46 U4.47 U5.5 U5.6 U5.12 U5.13 U7.10 U7.11 U7.12 U7.13 U8.10 U8.11 U8.12 U9.28 U9.29 U9.30 U9.32 U9.33
copper on no net:
  other v1: 215.011,143.764

## Polygon pours and split planes (outlines as drawn)
GND on Top Layer "GND_L01_P001" (solid, pour order 1): 229.743,175.26 229.743,25.4 160.782,25.4 160.655,25.527 160.655,49.911 163.068,52.324 169.164,52.324 170.815,53.975 170.815,88.265 170.18,88.9 32.385,88.9 30.48,90.805 30.48,175.26
GND on Bottom Layer "GND_L02_P002" (solid, pour order 2): 30.48,175.26 229.743,175.26 229.743,25.4 160.655,25.4 160.655,49.911 163.068,52.324 169.164,52.324 170.815,53.975 170.815,88.265 170.18,88.9 32.385,88.9 30.48,90.805

## Keep-outs
Keep-Out Layer:
  lines w0.3: 0,25.4 25.4,25.4 229.743,25.4 229.743,175.26 0,175.26 0,25.4

## Other copper
Top Layer:
  region net +3V3: 175.26,100.457 175.26,106.426 175.006,106.68 173.482,106.68 173.228,106.426 173.228,102.489 172.593,101.854 172.593,100.457
  region net +3V3: 166.878,33.782 166.878,31.75 168.021,30.607 204.978,30.607 205.74,31.369 205.74,33.08 204.635,34.104 204.635,36.449 208.915,36.449 208.915,34.97 208.915,34.104 207.772,33.147 206.395,32.785 208.003,35.016 207.772,34.696 207.772,29.718 205.994,27.94 164.592,27.94 162.814,29.718 162.814,33.782
  region net +3V3: 214.503,38.735 215.011,38.227 215.011,34.684 214.401,34.074 199.733,34.074 199.136,34.671 199.136,38.227 199.644,38.735
  region net +3V3: 225.425,62.23 226.822,62.23 227.203,61.849 227.203,60.579 226.949,60.325 210.82,60.325 210.185,59.69 210.185,58.42 209.804,58.039 203.822,58.039 203.111,58.75 203.111,61.531 203.81,62.23 226.568,62.23 226.949,61.849
  region net +3V3: 192.151,99.822 187.452,99.822 186.576,100.698 186.576,106.921 186.068,107.429 184.036,107.429 183.578,106.972 183.578,96.533 184.988,95.123 192.151,95.123
  region net COM5: 162.037,70.929 165.659,70.929 166.687,69.901 166.688,54.508 164.909,52.73 148.018,52.73 146.71,51.422 146.71,36.614 145.567,35.471 140.906,35.471 139.649,36.728 139.649,55.131 142.113,57.594 159.525,57.594 160.642,58.712 160.642,69.939 161.633,70.929 162.037,70.929 164.859,70.929
  region net COM1: 63.792,35.484 64.757,34.519 70.371,34.519 71.438,35.585 71.437,50.317 67.945,53.81 54.521,53.81 53.556,54.775 53.556,69.355 52.083,70.828 46.825,70.828 45.377,69.38 45.377,51.422 49.606,47.193 62.357,47.193 63.792,45.758
  region net COM4: 134.633,71.196 136.969,71.196 138.913,69.253 138.913,65.43 137.884,64.402 130.467,64.402 128.321,62.255 128.321,36.525 127.317,35.522 121.171,35.522 120.231,36.462 120.231,65.024 126.403,71.196
  region net COM3: 103.695,70.637 108.979,70.637 110.147,69.469 110.147,36.017 109.169,35.039 102.921,35.039 102.095,35.865 102.095,69.367 103.188,70.46
  region net COM2: 75.654,70.752 80.759,70.752 81.737,69.774 81.737,59.601 83.68,57.658 87.973,57.658 90.348,55.283 90.348,35.331 89.548,34.531 83.045,34.531 82.207,35.37 82.207,51.232 80.747,52.692 77.394,52.692 74.651,55.435 74.651,69.748
  region net +12V: 61.951,76.048 62.96,77.082 62.96,86.354 65.024,88.511 65.024,93.865 65.443,94.285 66.98,94.285 67.399,93.866 67.399,87.325 65.748,85.674 65.748,76.996 66.726,76.073 66.726,75.4 61.951,75.4
  region net +12V: 90.582,75.921 91.592,76.955 91.592,86.227 93.655,88.384 93.655,93.738 94.075,94.158 95.611,94.158 96.03,93.739 96.03,87.198 94.379,85.547 94.379,76.869 95.357,75.946 95.357,75.273 90.582,75.273
  region net +12V: 119.151,75.921 120.161,76.955 120.161,86.227 122.225,88.384 122.225,93.738 122.644,94.158 124.181,94.158 124.599,93.739 124.599,87.198 122.948,85.547 122.948,76.869 123.926,75.946 123.926,75.273 119.151,75.273
  region net +12V: 43.98,98.654 40.475,98.654 38.633,96.812 38.633,86.182 37.401,84.95 37.44,84.912 37.44,77.267 38.646,76.06 147.218,76.06 148.247,77.089 148.247,86.97 148.285,86.97 150.165,88.849 150.165,94.475 150.584,94.894 152.159,94.894 152.502,94.551 152.502,87.312 151.333,86.144 151.333,75.692 148.895,73.254 36.792,73.254 34.341,75.705 34.341,85.319 36.754,87.732 36.716,87.77 36.716,98.158 40.043,101.486 43.98,101.486
  region net +12V: 50.15,138.112 86.802,138.112 86.802,141.376 85.71,142.469 46.48,142.469 43.483,139.471 43.483,99.151 43.98,98.654 47.841,98.654 48.36,99.172 48.36,136.322
  region net +3V9: 152.273,144.653 157.353,144.653 157.607,144.399 157.607,143.256 157.353,143.002 153.797,143.002 153.543,142.748 153.543,141.986 152.781,141.224 145.796,141.224 144.907,142.113 144.907,147.828 145.288,148.209 147.193,148.209 147.574,147.828 147.574,143.383 148.082,142.875 151.638,142.875 151.892,143.129 151.892,144.272
  region net +3V3: 130.81,118.808 131.233,118.491 131.445,118.491 137.414,118.491 137.668,118.237 137.668,113.284 137.16,112.776 137.16,112.395 139.7,112.395 140.081,112.395 140.081,112.903 139.573,113.284 139.573,120.142 139.065,120.65 131.191,120.65 130.81,120.269
  region net +5V: 210.82,65.405 211.074,65.151 212.471,65.151 212.725,65.405 212.725,73.533 212.344,73.914 207.645,73.914 207.391,73.66 207.391,69.596 206.756,68.961 201.676,68.961 200.914,69.723 200.914,74.041 200.533,74.422 196.264,74.422 195.707,74.676 195.707,75.311 195.199,75.819 192.786,75.819 192.278,75.311 192.278,71.12 192.786,70.612 195.072,70.612 195.58,71.12 195.58,71.755 195.961,72.136 198.755,72.136 199.009,71.882 199.009,68.707 200.279,67.437 210.693,67.437 210.82,67.31 210.82,66.675
  region net +3V3: 139.42,100.203 139.372,100.203 172.593,100.203 173.228,99.568 173.228,52.832 172.212,51.816 163.805,51.816 162.814,50.825 162.814,48.26 167.005,48.26 167.005,49.657 174.13,49.657 175.26,50.787 175.26,101.854 139.446,101.854 139.152,101.56 139.152,100.54
  region net VCC: 227.076,64.77 227.33,64.516 227.33,63.119 227.076,62.865 199.644,62.865 199.009,62.23 199.009,61.214 198.628,60.833 195.707,60.833 195.199,61.341 195.199,66.294 195.707,66.802 198.628,66.802 199.009,66.421 199.009,65.659 199.898,64.77
  region net +3V3: 165.989,37.846 166.878,36.957 166.878,33.782 166.497,33.401 163.195,33.401 162.814,33.782 162.814,48.26 163.449,48.895 166.37,48.895 167.005,48.26 167.005,45.847 166.37,45.212 165.989,44.831
  region net +3V3: 223.52,98.044 223.52,96.901 223.012,96.393 196.284,96.393 195.008,95.567 196.088,96.266 194.945,95.123 192.151,95.123 191.389,95.885 191.389,99.06 192.151,99.822 194.945,99.822 196.215,98.552 195.961,98.552 223.012,98.552
  region net +3V3: 179.165,137.02 192.303,137.02 192.303,136.398 192.303,131.166 192.088,130.95 187.82,130.95 187.325,131.445 187.325,133.579 179.121,133.579 178.702,133.998 178.702,136.629
  region net +3V3: 187.338,136.781 192.303,136.781 192.303,142.342 191.516,143.129 188.087,143.129 187.338,142.38
  region net +3.3V_1: 97.65,166.967 106.185,166.967 106.451,166.7 106.451,165.875 106.248,165.671 97.65,165.671
  region net +3.3V_1: 96.139,168.631 96.139,160.464 96.38,160.223 97.955,160.223 98.184,160.452 98.184,168.631 97.904,168.91 96.418,168.91
  region net +3V3: 95.428,168.91 82.753,168.91 82.296,168.453 82.321,168.427 82.321,157.937 89.98,157.937 89.98,166.497 95.44,166.497 95.72,166.776 95.72,168.618
  region net +3V3: 107.379,132.766 107.379,137.058 109.41,137.058 109.41,133.198 108.979,132.766
  region net +3V3: 105.816,137.058 105.816,122.225 105.816,121.488 106.286,121.018 107.023,121.018 107.251,121.018 107.734,121.501 107.734,121.73 107.734,137.058
  region net +3V3: 121.59,139.027 121.958,139.027 122.339,138.646 122.339,136.373 121.958,135.992 106.147,135.992 105.816,136.322 105.816,138.76 106.083,139.027
  region net NetC16_2: 154.191,173.088 153.683,172.58 153.683,145.555 154.203,145.034 158.432,145.034 159.106,145.707 159.106,172.555 158.458,173.203 154.28,173.203
  region net +1V8: 183.21,144.615 187.566,144.615 188.112,145.161 188.112,150.978 187.541,151.549 183.184,151.549 182.74,151.005 182.74,145.085
  region net +1V8: 177.203,147.892 177.648,147.447 177.648,145.212 177.254,144.818 171.145,144.818 170.751,145.212 170.751,147.498 171.145,147.892 171.526,147.892
  region net NetC22_1: 185.852,160.426 187.757,160.426 188.062,160.731 188.062,166.903 187.642,167.322 186.093,167.322 185.611,166.84 185.611,161.315 185.611,160.668
  region net NetC16_2: 164.465,160.82 155.918,160.82 155.918,163.055 164.465,163.055 164.821,162.7 164.821,161.176
  region net NetC5_2: 94.551,111.155 94.551,108.369 94.945,107.975 104.788,107.975 105.219,108.407 105.219,112.09 104.724,112.585 94.945,112.585 94.551,112.192
  region net +3V3: 149.275,112.916 149.669,112.522 149.669,110.299 149.174,109.804 119.977,109.804 119.469,110.312 119.469,112.42 119.825,112.776 121.475,112.776
  region net +3V3: 89.751,160.058 95.402,160.058 95.885,159.576 95.885,156.464 95.542,156.121 85.141,156.121 85.141,160.071
  region net +3V3: 75.616,151.74 75.921,151.435 84.76,151.435 85.344,152.019 85.344,159.283 82.321,159.283 82.321,153.391 75.933,153.391 75.616,153.073
  region net +3V9: 101.318,138.074 104.559,138.074 105.181,137.452 105.181,113.741 104.699,113.259 99.263,113.259 98.895,113.627 98.895,121.615 99.695,122.415 100.8,122.415 100.8,137.524
  region net +5V: 76.086,150.939 82.105,150.939 82.525,150.52 82.525,143.688 82.105,143.269 76.124,143.269 75.654,143.739 75.654,150.508
  region net +5V: 79.142,103.156 79.142,117.619 78.334,118.427 71.006,118.427 71.006,103.128
  region net NetD1_2: 57.925,114.071 57.925,111.201 58.331,110.795 63.614,110.795 63.665,110.846 63.665,114.414 58.268,114.414
  region net NetD1_2: 70.612,118.453 70.612,104.686 69.736,103.81 63.475,103.81 62.624,104.661 62.624,117.881 63.195,118.453
  region net NetD1_2: 69.787,122.111 70.612,122.11 70.612,115.811 69.696,115.811 69.696,122.022
  region net +5V: 71.006,117.842 71.006,122.111 72.047,122.111 72.047,117.832
  region net +5V: 50.571,102.654 50.571,99.266 51.235,98.603 78.13,98.603 79.142,99.615 79.142,103.156 51.104,103.187
  region net +12V: 86.639,121.641 90.513,121.641 90.97,121.183 90.97,115.57 90.576,115.176 86.639,115.176
  region net +12V: 86.802,138.112 81.013,138.112 81.013,115.837 81.674,115.176 86.815,115.176
  region net +12V: 56.858,119.152 56.858,140.322 63.373,140.322 63.373,119.152
  region net +12V: 65.303,122.123 69.177,122.123 69.482,121.818 69.482,119.634 68.999,119.151 57.861,119.151 57.861,122.111
Bottom Layer:
  region net +3V3: 205.486,61.763 205.486,64.135 204.47,65.151 202.311,65.151 201.422,66.04 201.422,87.757 201.168,88.011 199.898,88.011 199.644,87.757 199.644,64.516 201.168,62.992 203.2,62.992 203.708,62.484 203.708,61.782
  region net +3V3: 173.101,106.934 172.631,108.068 172.631,111.595 172.377,111.849 171.742,111.849 171.488,111.595 171.488,108.038 171.031,106.934
  region net +3V3: 204,34.112 205.219,34.112 205.486,34.379 205.486,62.001 205.27,62.217 203.822,62.217 203.708,62.103 203.708,34.353 203.975,34.087
  region net NO4: 115.938,68.047 120.409,68.047 121.526,66.929 121.526,64.059 119.786,62.319 119.786,36.208 118.808,35.23 111.798,35.23 110.922,36.106 110.922,66.739 112.23,68.047
  region net NO5: 148.26,67.958 149.327,66.891 149.327,57.963 146.71,55.347 139.306,55.347 137.782,53.823 137.782,36.538 136.563,35.319 130.861,35.319 129.642,36.538 129.642,58.039 133.452,61.849 142.151,61.849 142.748,62.446 142.748,66.84 143.866,67.958
  region net NO3: 97.561,67.843 100.762,64.643 100.762,35.7 99.746,34.684 92.113,34.684 91.173,35.624 91.173,61.468 86.728,61.468 85.407,62.789 85.407,66.599 86.652,67.843
  region net NO2: 58.371,70.386 63.142,70.386 64.313,69.215 64.313,58.776 65.57,57.518 77.102,57.518 81.09,53.53 81.089,35.509 79.858,34.277 73.368,34.277 72.161,35.484 72.161,50.178 70.968,51.371 61.087,51.371 57.417,55.042 57.417,69.431
  region net NO1: 28.925,70.104 34.861,70.104 36.005,68.961 36.005,53.391 39.192,50.203 59.995,50.203 62.141,48.057 62.141,35.471 60.947,34.277 55.118,34.277 54.064,35.331 54.064,41.681 52.235,43.51 32.347,43.51 27.94,47.917 27.94,68.996
  region net +3V3: 170.307,106.845 170.307,105.626 170.904,105.029 205.867,105.029 206.883,106.045 206.883,107.188 206.883,118.745 204.978,120.65 191.147,120.65 189.865,121.932 189.865,141.478 189.357,141.986 187.96,141.986 187.452,141.478 187.452,120.904 189.611,118.745 203.581,118.745 204.724,117.602 204.724,108.077 204.102,107.455 170.917,107.455
  region net +5V: 76.581,114.427 77.978,114.427 78.613,115.062 78.613,150.368 78.143,150.838 76.543,150.838 76.073,150.368 76.073,114.935
  region net +3V3: 189.484,106.807 188.887,108.248 188.887,111.595 188.633,111.849 187.998,111.849 187.744,111.595 187.744,108.248 187.147,106.807
  region net +3V3: 195.961,106.68 195.237,108.428 195.237,111.595 194.983,111.849 194.348,111.849 194.094,111.595 194.094,108.428 193.37,106.68
  region net +3V3: 89.154,158.496 89.916,158.496 90.424,157.988 90.424,123.952 91.567,123.19 107.569,123.19 107.95,122.809 107.95,121.412 107.569,121.031 91.567,121.031 90.551,120.396 90.551,103.378 92.075,101.854 145.771,101.854 146.685,102.997 146.685,112.522 147.066,112.903 148.209,112.903 148.59,112.522 148.59,101.854 146.939,100.203 91.186,100.203 88.646,102.743 88.646,157.988

## Silkscreen, mask and mechanical layers (free items; w line width, h text height)
Top Overlay:
  lines w0.3: 208.788,84.836 218.059,84.836 218.059,110.109 208.788,110.109 208.788,84.836
  text "+5V" at 141.097,168.91 h0.8
  text "GND" at 141.097,166.37 h0.8
  text "EN MAIN" at 141.097,163.83 h0.8
  text "TX" at 141.097,161.29 h0.8
  text "RX" at 141.097,158.75 h0.8
  text "BOOT" at 141.097,156.21 h0.8
  text "T_IRQ" at 209.55,104.908 h0.8
  text "MISO" at 214.122,104.902 h0.8
  text "T_CS" at 214.122,102.495 h0.8
  text "MOSI" at 209.55,102.362 h0.8
  text "SCK" at 209.55,99.695 h0.8
  text "MISO" at 213.995,99.695 h0.8
  text "+3V3" at 209.55,97.155 h0.8
  text "SCK" at 214.122,97.155 h0.8
  text "DC" at 214.122,94.869 h0.8
  text "MOSI" at 209.55,94.742 h0.8
  text "RST" at 209.55,92.202 h0.8
  text "CS" at 214.122,92.202 h0.8
  text "GND" at 209.55,89.408 h0.8
  text "+3V3" at 213.995,89.408 h0.8
  text "SPK+" at 219.964,77.851 h0.8
  text "SPK-" at 219.964,75.311 h0.8
  text "VCC" at 219.202,63.5 h0.8
  text "+3V3" at 219.202,60.96 h0.8
  text "SDA" at 219.202,58.42 h0.8
  text "SCL" at 219.202,55.88 h0.8
  text "TX" at 219.202,53.34 h0.8
  text "RX" at 219.202,50.8 h0.8
  text "GND" at 219.202,48.26 h0.8
  text "AC IN" at 36.449,45.847 h1.2
  text "AC IN" at 45.847,45.847 h1.2
  text "NO1" at 56.769,45.847 h1.2
  text "COM1" at 65.732,45.847 h1.2
  text "NO2" at 75.692,45.847 h1.2
  text "COM2" at 84.732,45.847 h1.2
  text "NO3" at 94.488,45.847 h1.2
  text "COM3" at 103.732,45.847 h1.2
  text "NO4" at 113.538,45.847 h1.2
  text "COM4" at 122.732,45.847 h1.2
  text "NO5" at 132.461,45.847 h1.2
  text "COM5" at 141.732,45.847 h1.2
  text "+3V3" at 162.433,38.608 h1.2
  text "GND" at 168.402,38.608 h1.2
  text "IN1" at 173.609,38.608 h1.2
  text "IN2" at 178.294,38.608 h1.2
  text "IN3" at 183.515,38.608 h1.2
  text "IN4" at 188.468,38.608 h1.2
  text "IN5" at 193.548,38.608 h1.2

## Text inside footprints (layer, text, board x,y; h text height)
C7: Top Overlay "+" at 79.919,126.127 h1; Mechanical 1 "+" at 85.019,126.127 h1
C63: Top Overlay "+" at 196.18,67.807 h1 r270; Mechanical 1 "+" at 196.18,62.707 h1 r270
IC1: Mechanical 15 "6" at 91.501,111.971 h1 r270; Mechanical 15 "4" at 89.586,111.956 h1 r270; Mechanical 15 "3" at 89.571,112.985 h1 r270; Mechanical 15 "1" at 91.542,112.97 h1 r270
IC2: Mechanical 15 "16" at 133.848,131.572 h1 r90; Mechanical 15 "9" at 142.357,132.334 h1 r90; Mechanical 15 "8" at 142.357,126.365 h1 r90; Mechanical 15 "1" at 133.731,126.365 h1 r90
J2: Top Overlay "△" at 219.443,106.096 h1 r270
P1: Top Overlay "1" at 209.877,121.912 h1 r90; Top Overlay "2" at 212.417,122.673 h1 r90; Top Overlay "9" at 209.866,134.739 h1 r90; Top Overlay "10" at 212.279,135.628 h1 r90